# Altium PCB Bracelet_Main.PcbDoc (part 3 of 3)
Units mil, origin at the board's own origin, x right, y up, seen from the top; angles counter-clockwise.
Board outline 865.94 x 2303.17 mil, 4 copper layers (Top Layer, POWER, GND, Bottom Layer), stack 7.834 mil thick; 115 components, 70 nets, 405 pads, 108 vias.
Unrouted connection lines stored in the file: 2.
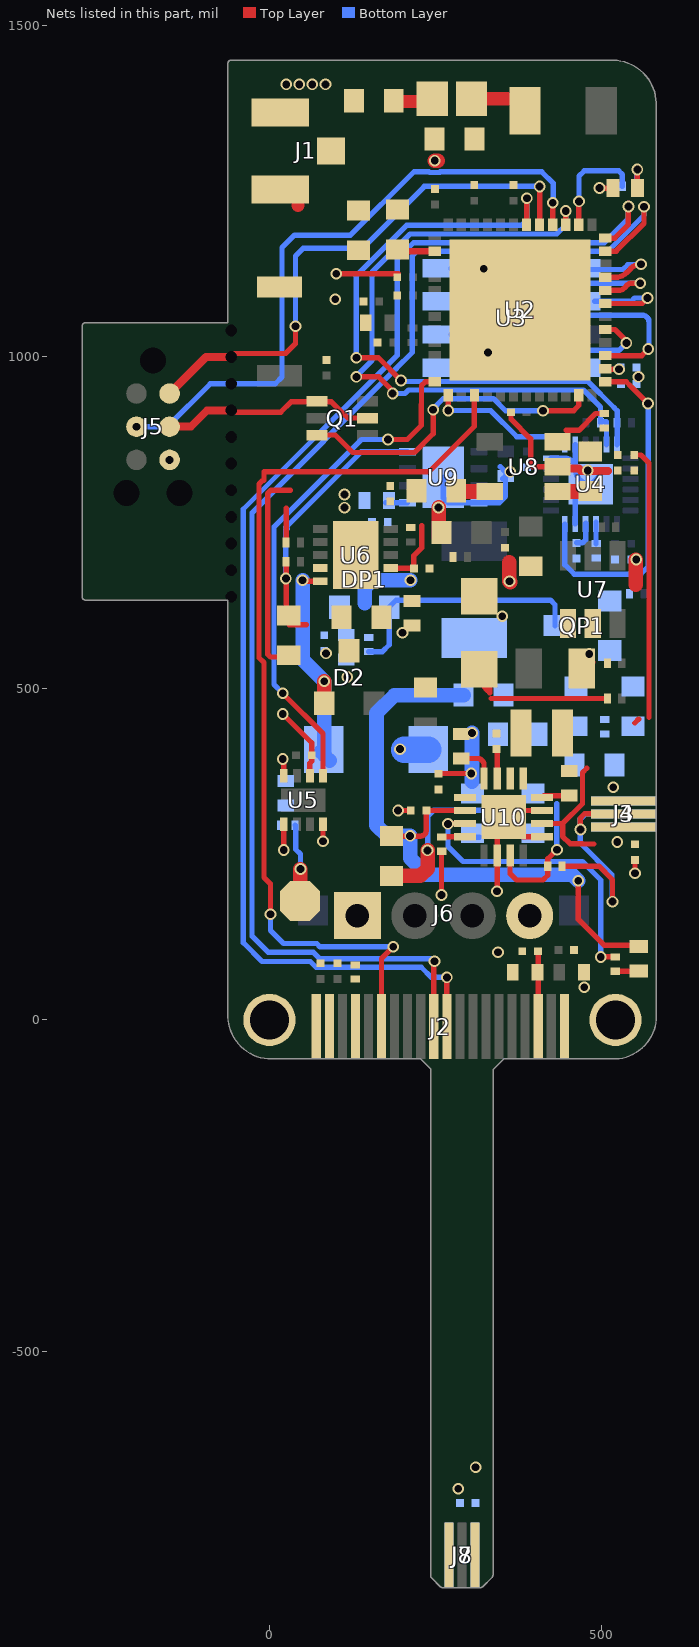
[diagram p4: the nets of this part, all layers, seen from the top]

## Via types
v1: diameter 17.72, hole 11.81, Top Layer to Bottom Layer, tented both sides, 100 vias
v2: diameter 17.72, hole 11.81, Top Layer to Bottom Layer, tented top, 4 vias
v3: diameter 17.72, hole 11.81, Top Layer to Bottom Layer, 4 vias

## Nets (pads, with @x,y where several pads share a name; then routed paths per layer and width w, separated by ;. In a path a pad name is that pad's centre, name@x,y a point inside that pad or via, vN(x,y) a via of type N, cw(c..) or ccw(c..) an arc to the next point about the centre after c; other vN are vias at no path point) (continued)
FEED: SB1.1 SB2.1 U2.2 | length 58.1
  Top Layer w10: SB1.1@143.76,1161.26 SB1.1@145.88,1159.14 ; SB2.1@194.76,1160.26 195.88,1159.14 U2.2@249.36,1159.14
FEED#: C8.1 L1.2 SB2.2 | length 62.2
  Top Layer w20: C8.1@193.79,1384.83 L1.2@254.56,1384.83 ; L1.2@254.56,1385.83 L1.2@255.56,1384.83
GND: C1.2 C2.2 C3.2 C4.2 C5.2 C6.2 C7.2 C8.2 C9.2 C10.2 C11.2 C12.2 C13.2 C14.2 C15.2 C16.2 C17.1 C18.2 C20.2 C21.2 C22.2 C23.2 C24.2 C25.2 C26.2 C27.2 C28.2 C29.2 C30.2 C31.2 C32.2 C33.2 C34.2 C35.2 C36.2 C38.2 C39.2 C40.1 C41.2 C42.2 C45.2 C46.2 C47.2 C48.2 CP1.1 CU1.2 CU2.2 J1.2 J1.3 J2.1 J2.19 J2.20 J3.3 J4.1 J5.6 J6.4 J7.3 J8.1 LED1.2 pad.MH1 pad.MH2 pad.NC@-57.51,798.66 QP1.2 R3.1 R9.1 R12.1 R15.2 R16.2 RP3.1 SB10.2 SB14.2 SW1.2 U2.49 U3.4 U4.11 U4.18 U4.20 U4.25 U5.4 U5.6 U6.11 U7.2 U8.2 U9.4 U9.9 U10.6 U10.9 U10.11 U10.12 U10.17 | length 1994.9
  Top Layer w8: v1(20.08,461.42) 63.78,417.72 C18.2@63.78,399.21 63.78,389.76 61.02,387.01 U5.6@61.02,368.11 ; SW1.2@22.25,1113.56 SW1.2@31.68,1113.56 ; R12.1@25.31,719.91 25.31,771.66 ; C30.2@29.13,547.24 1.58,547.24 -2.74,551.56 -2.74,793.72 2.36,798.82 31.89,798.82 ; SW1.2@38.18,1115.49 ccw(c38.18,1103.56) SW1.2@31.68,1113.56 ; SW1.2@40.76,1115.05 27.76,1102.05 26.25,1103.56 cw(c38.18,1103.56) SW1.2@31.68,1113.56 ; v1(80.71,269.29) U5.4@80.71,295.07 ; v1(100.79,1125.2) C5.2@194.35,1125.2 ; C5.2@192.14,1119.26 C5.2@192.65,1119.77 ; v1(194.1,315.75) C38.2@212.99,315.75 ; C36.2@255.42,371.26 255.63,371.47 v1(304.25,371.47) ; C36.2@258.22,371.24 258.22,370.91 C36.2@258.57,371.26 ; v1(259.45,188.19) 259.45,253.94 R15.2@259.84,254.33 ; v1(343.31,194.09) U10.6@343.31,247.83 343.31,296.06 U10.17@353.15,305.91 ; C6.2@364.12,916.19 364.12,905.84 393.85,876.11 393.85,837.25 396.85,834.25 U8.2@434.62,834.25 ; U10.11@411.22,315.75 362.99,315.75 U10.17@353.15,305.91 ; U10.12@411.22,335.43 413.98,338.19 C39.2@451.97,338.19 ; U10.9@421.26,277.16 412.01,277.16 U10.9@411.22,276.38 382.68,276.38 U10.17@353.15,305.91 ; C25.2@486.76,538.1 C25.2@487.76,539.1 ; v1(497.76,1254.26) LED1.2@517.76,1254.26 ; 510.76,827.95 511.25,828.44 ; C20.2@525.25,828.44 C20.2@525.44,828.25 ; v1(551.18,221.26) C41.2@551.18,241.34 C41.2@552.76,239.76
  Top Layer w12: U8.2@434.62,834.25 434.62,831.25 466.76,831.25 469.67,828.34 ; 510.76,827.95 v1@483.07,827.95 ; 469.67,828.34 470.06,827.95 v1@483.07,827.95 ; 469.67,828.34 v1(479.92,828.34) 482.68,828.34 v1@483.07,827.95
  Top Layer w20: 43.06,1228.19 43.21,1228.35
  Top Layer w22: v1(249.21,1295.67) v1@253.54,1295.67 ; CP1.1@255.12,728.74 v1@255.12,772.65 ; 361.81,690.16 v1(361.81,661.42) v1@362.85,660.38 ; 552.44,655.91 v1@552.44,694.09
  Bottom Layer w8: v1@111.02,788.98 v1@113.39,788.98 ; v1@111.42,770.47 ccw(c111.42,772.44) v1(113.39,772.44) ; U9.9@262.1,818.25 262.1,787.25 269.49,779.87 U9.4@316.24,779.87 346.72,779.87 356.1,789.25 C34.2@356.1,820.25 C34.2@351.83,815.98 ; U3.4@273.72,1133.56 ccw(c274.72,1133.56) 274.72,1132.56 v1(323.25,1132.56) ; 348.03,834.25 355.91,826.38 v1(362.99,826.38) ; U4.18@424.81,847.04 445.26,847.04 cw(c445.26,831.29) U4.25@461.01,831.29 ; U4.11@461.01,747.84 461.01,784.05 cw(c484.63,784.05) U4.25@484.63,807.67 ; U4.20@461.01,867.5 U4.25@461.01,831.29 ; U4.25@496.76,819.8 U4.25@484.63,807.67 ; U4.25@461.01,831.29 ccw(c484.63,831.29) U4.25@484.63,807.67
  Bottom Layer w22: 305.51,359.53 v1(305.51,432.68)
  other v1: 474.8,49.21 344.49,101.97 518.5,350.79 482.28,551.97 85.43,552.75 200.79,583.86 553.15,694.09 254.76,772.65 113.39,792.13 556.69,969.68 329.76,1006.26 99.21,1086.61
  other v2: 25.31,1410.67 45,1410.67 64.68,1410.67 84.37,1410.67
  other v3: 310.95,-674.61 -150.51,844.5
GPIO17: U2.27 U3.2 | length 434.7
  Top Layer w8: U2.27@508.34,1003.56 ccw(c508.34,1001.66) U2.27@506.45,1001.66 561.36,1001.66 v1(571.25,1011.56)
  Bottom Layer w8: U3.2@273.72,1033.56 283.72,1033.56 ; 389.61,1033.56 405.06,1033.56 ccw(c405.06,1050.26) 421.76,1050.26 cw(c434.06,1050.26) 434.06,1062.56 562.25,1062.56 ; 563.25,1062.56 562.25,1062.56 ; v1@569.25,1013.56 v1@569.25,1014.56 ; v1@572.25,1012.56 572.25,1052.56 ccw(c562.25,1052.56) 562.25,1062.56
  Bottom Layer w22: 283.72,1033.56 389.61,1033.56
INT1: U2.25 U4.12 | length 524.3
  Top Layer w8: U2.25@506.45,962.29 538.1,962.29 545.28,955.12 ; 543.7,956.69 v1(571.01,929.39)
  Bottom Layer w8: U4.12@445.26,747.84 445.26,686.5 459.71,672.05 559.84,672.05 571.01,683.21 v1(571.01,929.39)
INT2: U2.13 U4.19 | length 185.3
  Top Layer w8: v1@269.64,920.52 U2.13@269.64,942.02
  Bottom Layer w8: v1(269.68,918.9) 333.52,918.9 373.04,879.39 417.12,879.39
IO_0: Q1.3 U2.23 | length 487.9
  Top Layer w8: Q1.3@71.65,881.89 99.21,881.89 125.59,855.51 218.5,855.51 246.85,883.86 v1(246.85,920.08) ; v1(412.6,918.5) 458.66,918.5 466.49,926.33 U2.23@466.49,942.02
  Bottom Layer w8: v1@245.85,920.6 262.03,936.78 337.96,936.78 356.24,918.5 v1(412.6,918.5)
LED_PIN_: R2.2 U2.38 | length 162.7
  Top Layer w8: U2.38@466.49,1199.1 466.49,1234.54 v1(466.76,1234.26)
  Top Layer w10: U2.38@466.18,1199.1 U2.38@466.49,1199.1
  Bottom Layer w8: v1(466.76,1234.26) 466.76,1272.26 474.76,1280.26 526.76,1280.26 532.11,1274.91 R2.2@532.11,1257.26
LX_: D2.1 L3.1 U6.4 U6.5 | length 347.6
  Top Layer w8: v1@50.96,661.91 51.33,661.54 U6.5@76.82,661.54
  Top Layer w22: D2.1@82.68,477.56 v1(82.68,510.63)
  Bottom Layer w22: v1(49.96,662.91) 49.96,543.31 v1(82.68,510.63) 82.64,404.46 L3.1@77.28,404.46 ; L3.1@82.64,399.09 L3.1@90.56,391.18
NetAE_1: AE.1 C7.1 L1.1 | length 60.5
  Top Layer w20: L1.1@298.62,1388.83 359.11,1388.83
NetC17_2: C17.2 U4.10 | length 40.9
  Bottom Layer w8: C17.2@462.99,719.29 472.05,719.29 476.76,724 U4.10@476.76,747.84 U4.10@476.76,749.2
NetC19_1: C19.1 R6.1 U5.1 | length 31.1
  Top Layer w8: v1(21.65,256.3) U5.1@21.65,287.4
NetC19_2: C19.2 U5.8 | length 25.2
  Top Layer w8: U5.8@21.65,368.11 v1@21.65,393.31
  other v1: 20.08,393.31
NetC37_1: C37.1 L4.1 U10.13 U10.14
NetC37_2: C37.2 U10.15 | length 45
  Top Layer w8: C37.2@342.42,408.51 cw(c342.42,407.63) 343.31,407.63 U10.15@343.31,363.98
NetC40_2: C40.2 U10.16 | length 60.6
  Top Layer w8: C40.2@289.07,394.33 313.53,394.33 cw(c313.53,384.24) 323.62,384.24 U10.16@323.62,363.98
NetD1_K: D1.K R8.1 SB6.1 | length 223
  Top Layer w8: D1.K@316.93,525.2 ccw(c357.48,525.2) 332.24,493.46 D1.K@332.24,504.63 ; 334.25,484.65 R8.1@509.63,484.65
NetDP1_1: DP1.1 QP1.3 RP1.1 | length 380.9
  Bottom Layer w8: RP1.1@149.61,555.28 170.24,555.28 180.71,565.75 DP1.1@180.71,622.44 191.28,633.02 423.68,633.02 430.71,625.98 QP1.3@430.71,594.49
NetJ1_1: J1.1 SB1.2
NetJ2_17: J2.17 R16.1 | length 20
  Top Layer w8: J2.17@128.35,-1.17 J2.17@129.73,-2.55 ; J2.17@129.73,-2.55 132.28,-5.11 131.5,-5.89 132.68,-7.08 J2.17@129.73,-10.02 J2.17@129.73,-2.55
NetLED1_1: LED1.1 R2.1 | length 53.4
  Top Layer w8: LED1.1@554.76,1254.26 v1(554.76,1282.26)
  Bottom Layer w8: R2.1@553.76,1257.26 553.76,1281.26 v1(554.76,1282.26)
NetLED2_2: LED2.2 R14.1 | length 36.2
  Top Layer w8: R14.1@528.74,73.63 LED2.2@564.96,73.63
NetP2_1: P2.1 R6.2 | length 122.8
  Top Layer w22: v1@46.26,226.97 P2.1@46.26,179.53 ccw(c41.05,184.75) P2.1@48.43,184.75
  Bottom Layer w8: R6.2@38.63,293.7 39.51,292.82 39.51,257.34 46.85,250 v1(46.85,227.56)
NetQP1_1: QP1.1 RP2.1
NetR3_2: R3.2 U4.9 | length 32.1
  Bottom Layer w8: R3.2@492.51,718.11 U4.9@492.51,747.84 U4.9@492.51,750.2
NetR14_2: R14.2 U10.3 | length 453.3
  Top Layer w8: v1@266.54,296.06 v1@269.69,296.06 ; v1(269.29,295.67) v1@269.69,296.06 ; U10.3@295.08,296.06 v1@269.69,296.06 ; v1@499.61,96.06 500.39,95.28 R14.2@521.65,95.28
  Bottom Layer w8: v1(269.29,295.67) 269.29,261.42 291.87,238.83 324.61,238.83 324.73,238.95 361.89,238.95 362.01,238.83 471.8,238.83 499.61,211.02 499.61,185.89 499.46,185.74 499.46,95.02 v1(499.61,94.88)
NetR15_1: R15.1 U10.4 | length 35.2
  Top Layer w8: R15.1@259.84,276.38 U10.4@295.08,276.38
NetR18_1: R18.1 SB8.1 SB10.1
NetR18_2: R18.2 SB7.2 SB9.2
NetR19_1: R19.1 SB12.1 SB14.1 | length 21
  Bottom Layer w8: SB14.1@295.24,275.43 SB14.1@316.24,275.43
NetR19_2: R19.2 SB11.2 SB13.2 | length 247.1
  Top Layer w22: SB11.2@193.31,217.17 227.4,217.17 238.53,228.29 v1(238.53,255.67)
  Bottom Layer w8: v1(238.53,255.67) 238.53,306.64 247.98,316.09 346.91,316.09 R19.2@351.57,311.42
NetSB3_2: SB3.2 U8.1 | length 37.2
  Top Layer w22: U8.1@436.62,796.85 SB3.2@473.85,796.85
NetSB4_1: SB4.1 U8.5 | length 50.9
  Top Layer w22: SB4.1@281.76,795.59 SB4.1@282.87,794.49 ; SB4.1@282.87,796.85 U8.5@332.25,796.85
NTC: J3.2 J4.2 R17.1 | length 418.2
  Top Layer w8: R17.1@441.34,231.89 496.85,231.89 517.32,211.42 v1(517.32,178.35) ; v1(468.9,287.01) 468.9,304.45 475.53,311.08 505.91,311.08 506.36,310.63 J3.2@534.25,310.63 J3.2@534.65,310.63
  Bottom Layer w8: v1@466.14,287.79 v1@466.93,287.01 ; v1@516.54,178.35 516.54,218.82 468.9,266.46 v1(468.9,287.01) 468.9,303.15 476.38,310.63 J4.2@534.25,310.63 J4.2@534.65,310.63
PMIC_EN: RF1.1 U8.3 | length 76.3
  Top Layer w8: U8.3@434.62,871.65 U8.3@442.91,871.65 ; 447.58,889.04 466.59,889.04 491.93,914.37 RF1.1@505.12,914.37
REGN: C38.1 LED2.1 SB7.1 SB11.1 U10.2 | length 985.2
  Top Layer w8: SB11.1@196.06,277.56 SB11.1@195.67,277.17 ; U10.2@295.08,315.75 C38.1@236.61,315.75 236.61,286.13 cw(c227.64,286.13) 227.64,277.17 SB11.1@195.67,277.17 ; v1(465.75,209.84) 465.75,151.57 504.58,112.74 562.85,112.74 LED2.1@564.96,110.63 ; SB11.1@195.67,277.17 194.49,275.98 193.31,277.17 SB11.1@195.67,277.17
  Bottom Layer w22: SB7.1@292.83,489.76 188.58,489.76 161.42,462.6 161.42,293.7 177.56,277.56 v1(212.2,277.56) 212.2,244.09 237.47,218.83 332.89,218.83 333.01,218.95 353.6,218.95 353.72,218.83 456.76,218.83 v1(465.75,209.84)
RES#: J2.15 U2.15 | length 1420.9
  Top Layer w8: v1(1.57,159.45) 1.57,205.21 -8.25,215.03 -8.25,538.69 -15.74,546.17 -15.74,799.1 -15.69,799.15 -15.69,808.06 -10.42,813.33 -8.25,813.33 -8.25,826.38 240.27,826.38 309.01,895.12 U2.15@309.01,942.02 ; J2.15@167.32,-8.25 J2.15@169.1,-10.02 169.1,92.72 v1(186.61,110.24)
  Bottom Layer w8: v1(1.57,159.45) 1.57,135.04 21.45,115.17 71.31,115.17 76.24,110.24 v1(186.61,110.24)
RTS: J5.4 pad.NC@-57.51,919.13 Q1.1 Q1.5 | length 327.9
  Top Layer w8: pad.NC@-57.51,919.13 -57.51,916.5 17.01,916.5 32.39,931.89 93.7,931.89 118.11,907.48 Q1.5@148.03,907.48
  Top Layer w12: J5.4@-150.51,894.5 -118.51,894.5 -93.88,919.13 pad.NC@-57.51,919.13
RXD: J5.3 pad.NC@-57.51,959.29 U2.40 | length 972.6
  Top Layer w8: U2.40@427.12,1199.1 v1(427.12,1232.26)
  Bottom Layer w8: v3(-200.51,894.5) -153.92,894.5 -89.13,959.29 pad.NC@-57.51,959.29 8.8,959.29 19,969.5 19,1164.5 37.76,1183.26 122.24,1183.26 217.86,1278.88 240.75,1278.88 241.82,1277.81 256.61,1277.81 257.68,1278.88 410.55,1278.88 427.76,1261.66 427.76,1232.91 v1(427.12,1232.26)
SCL: R4.1 U2.39 U4.23 | length 993.5
  Top Layer w8: v1(131.1,969.68) 164.88,969.68 185.83,948.74 v1(185.83,944.49) ; U2.39@446.8,1199.1 v1(446.8,1219.73)
  Bottom Layer w8: v1@129.92,969.68 154.72,994.49 154.72,1127.61 212.17,1185.06 433.09,1185.06 446.8,1198.77 v1(446.8,1219.73) ; v1(185.83,944.49) 204.28,944.49 209.58,949.78 473.45,949.78 499.08,924.15 R4.1@499.08,904.25 ; R4.1@499.08,900.5 R4.1@499.08,904.25 ; U4.23@508.25,867.5 508.25,902.36 500.97,902.36 R4.1@499.08,904.25
SCLK: U2.31 U3.6 | length 164.8
  Top Layer w8: U2.31@507.45,1081.4 U2.31@506.45,1080.4 ; U2.31@508.29,1078.56 U2.31@506.45,1080.4 ; v1(570.25,1088.56) 562.1,1080.4 U2.31@506.45,1080.4
  Bottom Layer w8: U3.6@490.25,1083.56 545.76,1083.56 550.76,1088.56 v1@567.25,1088.56 ; v1@573.25,1086.56 566.84,1086.56 ccw(c562.25,1088.56) v1@567.25,1088.56 ; v1@573.25,1088.56 v1(570.25,1088.56) v1@567.25,1088.56
SCLK_: J2.11 U2.35 | length 2008.8
  Top Layer w8: J2.11@247.04,-0.97 J2.11@247.84,-1.76 ; J2.11@247.84,-10.02 J2.11@247.84,-1.76 ; v1(248.82,88.58) 247.84,87.6 J2.11@247.84,-1.76 ; J2.11@250.39,0.79 J2.11@247.84,-1.76 ; U2.35@506.45,1159.14 522.84,1159.14 564.76,1201.07 v1(564.76,1226.26)
  Bottom Layer w8: v1(248.82,88.58) 245.02,92.38 75.71,92.38 65.92,102.17 -2.17,102.17 -26.4,126.4 -26.4,764.6 191.03,982.03 191.09,982.03 215.35,1006.3 215.35,1151.47 222.94,1159.06 510.56,1159.06 564.76,1213.26 v1(564.76,1226.26)
SD0: U2.32 U3.3 | length 362.3
  Top Layer w8: U2.32@506.45,1100.09 526.59,1100.09 ccw(c526.59,1112.35) 535.25,1103.68 540.21,1108.63 cw(c545.61,1103.25) 545.61,1110.87 v1(559.25,1110.87)
  Bottom Layer w8: 386.76,1083.56 409.06,1083.56 ccw(c409.06,1096.26) 421.76,1096.26 cw(c436.38,1096.26) 436.38,1110.87 v1(559.25,1110.87) v1@560.11,1110.87 ; v1@559.25,1112.87 ccw(c540.7,1094.32) 556.96,1114.91 cw(c554.25,1109.56) v1@560.11,1110.87 ; v1@562.41,1110.87 v1@561.57,1110.87 ; v1@560.11,1110.87 cw(c554.25,1109.56) 560.25,1109.56 v1@561.57,1110.87 ; v1@560.11,1110.87 v1@561.57,1110.87
  Bottom Layer w22: 283.72,1083.56 386.76,1083.56
SD1: U2.33 U3.5 | length 152.7
  Top Layer w8: U2.33@506.45,1119.77 522.08,1119.77 ccw(c522.08,1142.64) 538.24,1126.46 545.04,1133.26 ; 545.04,1133.26 cw(c560.25,1118.05) v1(560.25,1139.56)
  Bottom Layer w8: U3.5@473.25,1133.56 ccw(c478.08,1138.39) 478.08,1131.56 533.25,1131.56 540.25,1138.56 558.25,1138.56 cw(c558.25,1136.56) 560.25,1136.56 v1@560.25,1137.56
SD3: U2.29 U3.1 | length 315.8
  Top Layer w8: U2.29@506.45,1041.03 520.99,1041.03 v1@539.67,1022.35 ; v1(538.19,1020.86) v1@538.99,1020.86
  Bottom Layer w8: 283.72,983.56 340.56,983.56 ccw(c340.56,996.26) 353.26,996.26 cw(c366.56,996.26) 366.56,1009.56 526.88,1009.56 v1(538.19,1020.86)
SDA: R5.1 U2.42 U4.24 | length 967.8
  Top Layer w8: v1(131.1,998.43) 164.17,998.43 v1(198.42,964.17) ; U2.42@387.75,1199.1 388.19,1199.55 v1(388.19,1238.97) v1@388.19,1240.55
  Bottom Layer w8: v1(131.1,998.43) 131.1,1122.37 206.79,1198.06 380.34,1198.06 388.19,1205.9 v1(388.19,1238.97) ; v1(198.42,964.17) 199.82,962.78 480.23,962.78 519.94,923.07 519.94,922.92 524.25,918.6 R5.1@524.25,900.5 524.25,867.75 U4.24@524,867.5
SDIN_: J2.10 U2.36 | length 2000.6
  Top Layer w8: J2.10@266.26,-8.76 J2.10@267.52,-10.02 ; v1(267.52,64.17) J2.10@267.52,-10.02 ; J2.10@268.5,-9.04 J2.10@267.52,-10.02 ; U2.36@506.45,1178.83 520.76,1178.83 541.25,1199.32 v1(541.25,1226.56) v1@541.25,1231.56
  Bottom Layer w8: v1(267.52,64.17) 244.09,64.17 228.89,79.38 70.33,79.38 61.51,88.2 -11.03,88.2 -39.4,116.57 -39.4,769.99 185.64,995.03 185.7,995.03 192.52,1001.85 192.52,1147.02 217.56,1172.06 505.17,1172.06 541.25,1208.13 v1(541.25,1226.56)
SW_AD: D1.A L2.2 U7.1
  other v1: 351.18,608.66
TCH_OUT: U2.12 U5.5 | length 771.8
  Top Layer w8: v1@21.65,490.94 80.71,431.89 U5.5@80.71,368.11 ; v1(178.74,875.2) 207.87,875.2 228.99,896.31 228.99,927.47 229.28,927.77 229.28,956.45 235.13,962.29 U2.12@249.36,962.29
  Bottom Layer w8: v1(20.08,492.52) 6.94,505.65 6.94,743.44 138.7,875.2 v1(178.74,875.2)
TS: R17.2 SB8.2 SB9.1 SB12.2 SB13.1 U10.7 | length 198.8
  Top Layer w8: U10.7@362.85,241.97 362.85,220.62 372.44,211.02 412.6,211.02 419.68,218.11 R17.2@419.68,231.89 419.68,242.91 v1(433.46,256.69)
  Bottom Layer w8: 433.07,325.98 433.07,257.09 v1(433.46,256.69)
TXD: J5.2 pad.NC@-57.51,999.45 U2.41 | length 826.5
  Top Layer w8: pad.NC@-57.51,999.45 -52.19,1004.77 24.46,1004.77 39.37,1019.68 v1(39.37,1046.06) ; U2.41@407.43,1199.1 406.76,1199.77 407.48,1200.49 v1(407.48,1256.69)
  Top Layer w12: J5.2@-150.51,944.5 -95.57,999.45 pad.NC@-57.51,999.45
  Bottom Layer w8: v1(39.37,1046.06) 39.37,1151.97 50.79,1163.39 140.16,1163.39 233.6,1256.83 407.34,1256.83 v1(407.48,1256.69) v1@405.05,1254.26
VBAT: C22.1 C23.1 C24.1 C28.1 C29.1 DP1.2 L3.2 R13.1 RP1.2 SB4.2 U6.7 | length 235.5
  Top Layer w8: U6.7@183.11,681.22 215.79,681.22 C28.1@215.79,680.91 ; C28.1@217.75,680.91 217.75,700.03 229.53,711.81 229.53,745.28
  Bottom Layer w22: 143.7,628.35 143.7,651.57 155.12,662.99 v1(212.6,662.99)
  Bottom Layer w40: v1@203.03,407.6 L3.2@239.48,407.6
  other v1: 196.85,408.27
VBAT#: C20.1 C21.1 C39.1 C41.1 J3.1 J4.3 L4.2 RF1.2 SB3.1 U10.10 | length 626.3
  Top Layer w8: U10.10@411.22,296.06 442.13,296.06 ; 465.29,265.35 472.05,265.35 ; 478.43,379.53 472.05,373.14 472.05,325.98 442.13,296.06 ; 488.98,265.35 472.05,265.35 ; C21.1@550.01,851.87 560.33,851.87 572.44,839.76 572.44,456.3 ; 550.79,447.64 556.69,453.54 ; 442.13,296.06 442.13,276.77 453.15,265.75 471.65,265.75 472.05,265.35
  other v1: 524.41,268.11
VBUS: C30.1 C31.1 C32.1 C33.1 C42.1 D2.3 J7.1 J8.3 R11.1 U9.5 U9.8 | length 465.6
  Top Layer w8: R11.1@25.31,690.91 25.31,620.38 29.37,616.31 29.37,595.91 55.96,595.91
  Bottom Layer w8: v1(24.8,665.75) 24.8,738.19 27.17,740.55 24.8,742.91 138.53,856.64 U9.8@207.97,856.64 ; C32.1@174.99,779.87 U9.5@207.97,779.87
  other v1: 284.63,-707.02 117.32,516.93
VCHG: C36.1 J6.1 U10.1
VCOMH_: C47.1 C48.1 J2.3 | length 113.7
  Top Layer w8: J2.3@403.94,-8.64 J2.3@405.32,-10.02 C48.1@405.32,101.77
VDDSDIO: C12.1 C13.1 U2.26 U3.8 | length 21.4
  Top Layer w8: U2.26@506.45,981.98 507.72,980.71 508.11,981.1 v1(527.16,981.1)
pads on no net: AE.2 D2.2 J2.4 J2.5 J2.6 J2.7 J2.8 J2.9 J2.12 J2.13 J5.MP5 J5.MP6 J5.MP7 J6.2 J6.3 J6.MP1 J6.MP2 J7.2 J8.2 U2.5 U2.6 U2.7 U2.8 U2.10 U2.11 U2.18 U2.20 U2.21 U2.22 U2.24 U2.28 U2.34 U2.44 U2.45 U2.47 U2.48 U4.1 U4.2 U4.3 U4.4 U4.5 U4.6 U4.7 U4.14 U4.15 U4.16 U4.17 U4.21 U5.2 U5.3 U5.9 U6.1 U6.3 U6.6 U6.8 U6.10 U7.6 U8.4 U9.2 U9.3 U9.6 U9.7 U10.5 U10.8

## Polygon pours and split planes (outlines as drawn)
GND on Bottom Layer "Polygon_2" (hatched 45Degree grid 20 track 15, remove dead copper, pour order 4): 42.52,45.28 470.87,45.28 478.74,53.15 478.74,1343.31 42.52,1343.31
GND on Top Layer "Polygon_1" (hatched 45Degree grid 20 track 15, remove dead copper, pour order 6): 42.52,45.28 470.87,45.28 478.74,53.15 478.74,1343.31 42.52,1343.31
3V3 on POWER (split plane): 522.25,1425.81 522.25,1426.8 523.05,1426.74 528.99,1425.56 534.72,1423.62 540.14,1420.94 545.17,1417.58 549.72,1413.59 553.71,1409.04 557.07,1404.01 559.75,1398.58 561.69,1392.85 562.88,1386.92 563.16,1382.64 563.15,1382.61 563.17,1382.46 563.18,1382.27 563.17,1382.18 561.93,1382.18 562.49,1380.81 563.17,1380.87 563.17,619.14 319.16,619.14 319.16,970.47 318.82,973.9 317.82,977.2 316.2,980.24 314.01,982.91 288.81,1008.1 286.15,1010.29 283.11,1011.91 279.81,1012.92 276.38,1013.25 80.71,1013.25 77.28,1012.92 73.98,1011.91 70.94,1010.29 68.27,1008.1 66.09,1005.44 64.46,1002.4 63.46,999.1 63.12,995.67 63.12,622.72 63.12,107.88 63.12,107.87 63.46,104.44 64.46,101.14 66.09,98.1 68.27,95.44 134.6,29.11 134.6,-38.66 -0.57,-38.66 -0.52,-38.06 -1.88,-37.5 -4.05,-38.4 -8.61,-37.49 -14.34,-35.55 -19.77,-32.87 -24.8,-29.51 -29.35,-25.52 -33.34,-20.97 -36.7,-15.94 -39.38,-10.52 -41.32,-4.79 -42.5,1.15 -42.61,2.76 -41.53,5.37 -41.73,5.85 -42.65,5.82 -42.55,6.86 -42.55,633.02 -42.94,636.94 -44.08,640.71 -45.94,644.18 -48.44,647.23 -51.48,649.73 -54.96,651.58 -58.73,652.73 -62.65,653.11 -262.24,653.11 -262.24,1031.22 -62.65,1031.22 -58.73,1031.6 -54.96,1032.75 -51.48,1034.6 -48.44,1037.1 -45.94,1040.15 -44.08,1043.62 -42.94,1047.39 -42.55,1051.31 -42.55,1427.06 519.24,1427.06
no net on POWER (split plane): -42.75,4.86 -42.68,5.5
VBUS on POWER (split plane): 139.5,539.06 139.5,422.05 139.84,418.62 140.84,415.32 142.47,412.28 144.65,409.61 301.74,252.53 303.2,251.33 304.4,250.34 307.44,248.71 310.74,247.71 314.17,247.38 420.21,247.38 420.21,229.13 420.55,225.7 421.55,222.4 423.17,219.36 425.33,216.74 425.33,158.07 389.93,122.67 387.74,120.01 386.12,116.97 385.12,113.67 384.78,110.24 384.78,-38.66 353.47,-38.66 349.55,-39.04 345.78,-40.19 342.3,-42.05 339.26,-44.54 339.15,-44.67 339.08,-44.74 338.19,-43.86 337.85,-44.7 338.51,-45.3 322.96,-60.85 320.46,-63.9 318.61,-67.37 317.46,-71.14 317.08,-75.06 317.08,-830.74 311.9,-835.92 267.42,-835.92 263.24,-831.74 263.24,-74.06 262.85,-70.14 261.71,-66.37 259.85,-62.9 257.35,-59.85 242.8,-45.3 243.47,-44.7 243.12,-43.86 242.24,-44.74 242.16,-44.67 242.06,-44.54 239.01,-42.05 235.54,-40.19 231.77,-39.04 227.85,-38.66 169.77,-38.66 169.77,36.39 169.44,39.82 168.44,43.12 166.81,46.16 164.62,48.83 98.29,115.16 98.29,580.27
VBAT on POWER (split plane): 283.99,963.19 283.99,461.42 284.33,457.99 285.33,454.69 286.95,451.65 289.14,448.98 425.33,312.79 425.33,282.55 321.46,282.55 174.67,429.33 174.67,546.34 174.67,546.35 174.33,549.78 173.33,553.08 171.71,556.12 170.51,557.58 169.52,558.78 98.29,630.01 98.29,978.08 269.09,978.08
12V on POWER (split plane): 563.16,477.56 563.17,477.48 563.17,3.45 563.22,2.94 562.83,2.97 562.27,1.62 563.17,-0.55 562.26,-5.12 560.31,-10.85 557.64,-16.27 554.28,-21.3 550.29,-25.85 545.74,-29.84 540.71,-33.2 535.28,-35.88 529.55,-37.83 526.48,-38.44 526.48,-37.41 523.77,-38.54 523.79,-38.66 419.95,-38.66 419.95,102.95 455.35,138.35 456.33,139.55 457.53,141.02 459.16,144.06 460.16,147.36 460.5,150.79 460.5,320.08 460.16,323.51 459.16,326.81 457.53,329.85 456.33,331.31 455.35,332.51 319.16,468.7 319.16,583.98 563.16,583.98
GND on GND (split plane): 522.25,1425.81 522.25,1426.8 523.05,1426.74 528.99,1425.56 534.72,1423.62 540.14,1420.94 545.17,1417.58 549.72,1413.59 553.71,1409.04 557.07,1404.01 559.75,1398.58 561.69,1392.85 562.88,1386.92 563.16,1382.64 563.15,1382.61 563.17,1382.46 563.18,1382.27 563.17,1382.18 561.93,1382.18 562.49,1380.81 563.17,1380.87 563.17,3.45 563.22,2.94 562.83,2.97 562.27,1.62 563.17,-0.55 562.26,-5.12 560.31,-10.85 557.64,-16.27 554.28,-21.3 550.29,-25.85 545.74,-29.84 540.71,-33.2 535.28,-35.88 529.55,-37.83 526.48,-38.44 526.48,-37.41 523.77,-38.54 523.79,-38.66 353.47,-38.66 349.55,-39.04 345.78,-40.19 342.3,-42.05 339.26,-44.54 339.15,-44.67 339.08,-44.74 338.19,-43.86 337.85,-44.7 338.51,-45.3 322.96,-60.85 320.46,-63.9 318.61,-67.37 317.46,-71.14 317.08,-75.06 317.08,-830.74 311.9,-835.92 267.42,-835.92 263.24,-831.74 263.24,-74.06 262.85,-70.14 261.71,-66.37 259.85,-62.9 257.35,-59.85 242.8,-45.3 243.47,-44.7 243.12,-43.86 242.24,-44.74 242.16,-44.67 242.06,-44.54 239.01,-42.05 235.54,-40.19 231.77,-39.04 227.85,-38.66 -0.57,-38.66 -0.52,-38.06 -1.88,-37.5 -4.05,-38.4 -8.61,-37.49 -14.34,-35.55 -19.77,-32.87 -24.8,-29.51 -29.35,-25.52 -33.34,-20.97 -36.7,-15.94 -39.38,-10.52 -41.32,-4.79 -42.5,1.15 -42.61,2.76 -41.53,5.37 -41.73,5.85 -42.65,5.82 -42.55,6.86 -42.55,633.02 -42.94,636.94 -44.08,640.71 -45.94,644.18 -48.44,647.23 -51.48,649.73 -54.96,651.58 -58.73,652.73 -62.65,653.11 -262.24,653.11 -262.24,1031.22 -62.65,1031.22 -58.73,1031.6 -54.96,1032.75 -51.48,1034.6 -48.44,1037.1 -45.94,1040.15 -44.08,1043.62 -42.94,1047.39 -42.55,1051.31 -42.55,1427.06 519.24,1427.06
GND on GND (split plane): 563.43,0.78 563.25,2.63

## Other copper
Top Layer:
  rectangle net 3V3: 41.34,53.94 114.57,68.5
  rectangle net GND: -5.91,-59.06 96.85,40.16
  rectangle net GND: -4.72,-52.36 31.5,84.65
  rectangle net GND: -4.72,74.41 137.01,91.73
  rectangle net 3V3: 41.34,45.67 114.57,61.81
  rectangle net NetJ2_17: 122.44,-59.06 137.01,64.57
  rectangle net GND: 333.86,50.79 388.19,112.2
  rectangle net GND: 453.54,-59.06 483.46,112.2
  rectangle net 12V: 420.47,48.03 448.03,113.39
  rectangle net VBUS: 260.24,-717.72 294.49,-696.85
  rectangle net GND: 4.33,531.1 94.09,565.35
  rectangle net GND: 438.19,-59.06 466.14,39.76
  rectangle net GND: 143.7,576.38 164.96,677.17
  rectangle net GND: 235.43,576.38 283.07,680.91
  rectangle net GND: 255.91,671.65 362.6,679.13
  rectangle net GND: 349.21,631.5 563.39,670.08
  rectangle net GND: 349.21,649.21 406.3,719.29
  rectangle net GND: 234.25,1253.07 264.96,1346.46
  rectangle net GND: 234.25,1246.85 374.41,1269.68
  rectangle net #EN_AD: 516.54,677.95 528.74,759.06
  rectangle net PMIC_EN: 414.17,858.27 459.33,900.79
  rectangle net GND: 150.79,752.36 190.55,787.8
  rectangle net GND: -6.69,752.36 164.57,804.33
  rectangle net VBAT: 173.23,797.64 208.66,816.14
  rectangle net GND: 74.41,988.58 96.85,1022.05
  rectangle net GND: 235.43,664.57 282.68,687.8
  rectangle net GND: 244.09,677.17 282.68,759.06
  rectangle net 3V3AD: 289.76,726.77 374.8,759.02
  rectangle net 3V3AD: 289.37,684.25 338.98,754.33
  rectangle net VBAT#: 497.76,843.7 537.4,901.18
  region net VBAT: 200,759.45 200,735.83 238.76,735.83 238.76,759.45
  region net VBAT#: 483.46,297.64 483.46,257.48 583.46,257.48 583.46,297.64
  region net GND: 482.28,359.06 482.28,323.23 583.86,323.23 583.86,359.06
  region net GND: 275.98,442.91 275.98,421.65 317.32,421.65 317.32,442.91
  region net GND: 394.09,342.13 394.09,307.87 429.53,307.87 429.53,342.13
  region net GND: 153.96,649.61 153.96,589.76 193.7,589.76 193.7,649.61
  region net NetC37_1: 335.83,469.29 335.83,422.05 373.62,422.05 373.62,469.29
  region net NetC37_1: 357.09,469.29 357.09,347.24 399.21,347.24 399.21,469.29
  region net VBAT#: 423.23,469.29 423.23,366.14 577.56,366.14 577.56,469.29
  region net VCHG: 114.57,354.72 114.57,134.25 152.76,134.25 152.76,354.72
  region net VCHG: 114.57,354.72 114.57,329.92 312.6,329.92 312.6,354.72
  region net VBUS: 99.61,607.2 99.61,505.91 138.58,505.91 138.58,607.2
  region net GND: -42.13,1368.31 -42.13,1083.56 62.99,1083.56 62.99,1368.31
  region net NetJ1_1: 71.26,1333.07 71.26,1203.94 155.51,1203.94 155.51,1333.07
  region net FEED#: 168.11,1422.05 168.11,1361.02 272.64,1361.02 272.64,1422.05
  region net SW_AD: 288.58,625.2 288.58,571.54 464.17,571.54 464.17,625.2
  region net GND: 450.94,555.71 450.94,499.21 515.67,499.21 515.67,555.71
  region net GND: 470.48,669.29 470.48,507.36 504.33,507.36 504.33,669.29
  region net 3V3AD: 474.41,733.07 474.41,677.95 500.79,677.95 500.79,733.07
  region net 3V3AD: 348.43,759.02 348.43,727.56 510.63,727.56 510.63,759.02
  region net VBUS: 9.06,637.31 9.06,575.31 138.58,575.31 138.58,637.31
  region net NetD1_K: 217.32,557.09 217.32,479.92 347.17,479.92 347.17,557.09
  region net RXD: -36.51,948.5 -36.51,970.72 -77.51,970.72 -77.51,948.5
  rectangle net VBAT: 199.61,735.43 238.76,816.14
  rectangle net FEED#: 168.11,1183.43 223.43,1389.43
  rectangle net FEED: 115.35,1146.26 221.26,1178.26
  rectangle net GND: 153.96,576.38 281.1,616.31
  rectangle net GND: 94.96,648.91 164.96,760.91
  rectangle net LX_: 65.96,655.91 88.06,686.91
  rectangle net VBAT: 202.5,622.31 227.63,686.91
  rectangle net GND: 120.76,1014.26 169.76,1028.26
  rectangle net GND: 123.76,1014.26 154.26,1096.26
  rectangle net GND: 74.41,1014.26 143.26,1096.26
  rectangle net GND: 186.76,1087.26 199.76,1129.26
  rectangle net ENABLE: 120.87,922.05 169.87,950
  rectangle net 3V3: 159.76,1051.26 181.26,1097.26
  rectangle net 3V3: 159.76,1034.26 215.76,1065.26
  rectangle net 3V3: 205.76,1034.26 224.76,1126.26
  rectangle net GND: 502.76,817.95 558.27,836.95
  rectangle net GND: -42.13,1341.73 144.88,1424.02
  rectangle net NetAE_1: 280.98,1300 413.78,1423.26
  rectangle net GND: 302.76,-856.3 319.29,-665.38
  region net TXD: -36.51,988.29 -36.51,1010.5 -77.51,1010.5 -77.51,988.29
  region net RTS: -36.51,907.82 -36.51,930.03 -77.51,930.03 -77.51,907.82
  region net DTR: -36.51,867.66 -36.51,889.87 -77.51,889.87 -77.51,867.66
  rectangle net VBUS: 260.24,-856.3 277.95,-696.85
  rectangle net VBAT#: 465.25,842.25 557.25,873.62
  rectangle net 3V3: 240.25,1119.77 258.25,1139.46
Bottom Layer:
  rectangle net GND: 225.98,762.2 294.09,787.25
  rectangle net GND: 343.64,806.3 392.52,840.94
  rectangle net INT2: 409.06,858.27 450.39,883.46
  rectangle net 3V3: 457.48,893.32 482.68,910.24
  rectangle net NetDP1_1: 164.96,603.94 211.42,641.73
  rectangle net 3V3AD: 125.59,683.46 286.61,731.89
  rectangle net GND: 102.36,533.46 128.35,544.09
  rectangle net GND: 76.77,544.09 128.35,563.39
  rectangle net VBAT: 76.13,570.08 157.48,642.52
  rectangle net GND: 546.85,952.76 580.32,996.46
  rectangle net NetQP1_1: 490.16,614.17 548.82,650
  rectangle net GND: 525.2,484.65 568.11,548.03
  rectangle net GND: 472.44,541.73 568.11,578.35
  rectangle net SW_AD: 259.84,546.46 370.47,624.02
  rectangle net 3V3AD: 259.45,683.46 386.61,751.97
  rectangle net GND: 102.76,744.88 163.78,801.18
  region net SCL: 493.7,909.06 493.7,893.29 512.6,893.29 512.6,909.06
  region net GND: 485.04,359.84 485.04,324.02 583.07,324.02 583.07,359.84
  region net VBAT#: 484.25,297.64 484.25,264.17 583.86,264.17 583.86,297.64
  region net NetR18_1: 521.85,458.66 521.85,365.35 566.14,365.35 566.14,458.66
  region net NetR18_1: 488.19,437.8 488.19,365.35 534.65,365.35 534.65,437.8
  region net NetR18_2: 488.19,477.95 488.19,446.85 514.57,446.85 514.57,477.95
  region net NetR18_2: 443.31,522.05 443.31,472.05 514.57,472.05 514.57,522.05
  region net NetR18_2: 335.04,509.84 335.04,472.05 475.59,472.05 475.59,509.84
  region net TS: 378.74,464.57 378.74,325.2 479.92,325.2 479.92,464.57
  region net NetR19_2: 329.53,449.21 329.53,301.97 370.87,301.97 370.87,449.21
  region net NetR19_1: 288.98,296.46 288.98,259.45 414.57,259.45 414.57,296.46
  region net NetC19_1: 16.14,339.76 16.14,312.99 38.98,312.99 38.98,339.76
  region net NetC19_1: 9.84,339.76 9.84,244.09 27.56,244.09 27.56,339.76
  region net NetC19_2: 9.06,402.36 9.06,350.39 38.19,350.39 38.19,402.36
  region net VDDSDIO: 446.8,997.26 446.8,972.05 517.76,972.05 517.76,997.26
  region net VDDSDIO: 512.6,997.26 512.6,950.39 538.58,950.39 538.58,997.26
  region net VBUS: 171.26,860.63 171.26,744.88 190.16,744.88 190.16,860.63
  region net TXD: -36.51,988.29 -36.51,1010.5 -77.51,1010.5 -77.51,988.29
  region net RXD: -36.51,947.5 -36.51,969.72 -77.51,969.72 -77.51,947.5
  rectangle net GND: 226.1,770.87 294.1,865.25
  rectangle net GND: 303.16,-856.3 320.47,-673.57
  rectangle net VBUS: 261.02,-740.57 294.55,-696.57
  region net RTS: -36.51,907.82 -36.51,930.03 -77.51,930.03 -77.51,907.82
  region net DTR: -36.51,867.66 -36.51,889.87 -77.51,889.87 -77.51,867.66
  rectangle net VBUS: 261.02,-856.3 278.35,-730.98
  rectangle net GND: 457.09,687.4 553.94,701.57
  pour cut-out: 220.47,757.87 220.87,540.94 399.61,540.55 395.61,755.7 222.05,757.48
  pour cut-out: 157.48,519.68
  pour cut-out: 48.03,505.12 46.85,308.27 274.8,310.63 274.41,505.12 48.03,505.51
POWER (plane layer: these items are gaps in the copper):
  lines w10: 568.25,477.56 568.25,601.56
  lines w30: 581.89,235.43 581.89,281.5
  lines w35: 152.19,-50.2 152.19,36.39 80.71,107.87 80.71,622.72 ; 304.25,601.56 568.25,601.56 ; 437.8,229.13 437.8,264.96 314.17,264.96 157.09,422.05 157.09,546.35 80.71,622.72 ; 458.27,-58.27 402.36,-58.27 402.36,110.24 442.91,150.79 442.91,320.08 301.57,461.42 301.57,970.47 276.38,995.67 244.35,995.67 80.71,995.67 80.71,622.72

## Silkscreen, mask and mechanical layers (free items; w line width, h text height)
Fllex1 Top Overlay 1:
  circle w10: c466.93,39.37 r3.61
  text "ANT" at 414.57,1285.43 h60
  text "JTAG" at -279.13,959.06 h50 r270
  text "This part will" at -276.51,711.5 h30
  text "be removed" at -276.51,680.5 h30
  text "after prog." at -276.51,644.5 h30
  text "-VE" at 478.74,420.87 h45 r270
  text "TOUCH INPUT" at -51.18,358.66 h45 r270
  text "+VE" at 478.74,276.38 h45 r270
  text "THERMISTOR" at 221.65,201.18 h30
  text "GND" at 322.16,-745.35 h30 r90
  text "VBUS" at 281.16,-747.35 h30 r90
Fllex1 Bottom Overlay 1:
  text "-VE" at 583.46,340.63 h30
  text "+VE" at 583.46,254.72 h30
  text "VBUS" at 250.16,-746.94 h30 r270
Mechanical 1:
  text "38(mm) x 16.15(mm) is the inner casing size required for Complete PCB." at -278.35,1692.91 h45
Mechanical 2:
  lines w10: -57.63,5.37 -57.63,638.03 -277.32,638.03 -277.32,1046.3 -57.63,1046.3 ; -57.46,5.37 ccw(c3.75,7.19) -1.48,-53.83 ; -2.08,-53.74 46.46,-53.74 ; 43.19,-53.74 526.48,-53.74 ; 231.57,-55.4 248.16,-71.98 248.16,-837.98 261.17,-851 318.14,-851 332.16,-836.98 332.16,-72.98 349.74,-55.4 ; 522.25,1441.9 cw(c517.01,1380.88) 578.24,1382.18 578.25,1.26 ; 522.25,1442.14 -57.63,1442.14 ; 526.07,-53.74 ccw(c517.19,6.85) 578.2,1.62 ; -57.63,1046.3 -57.63,1442.14 ; -57.63,1046.3 -57.63,1442.14

## Dimensions
578.24,1382.18 to -293.51,1082.52 on Mechanical 1
522.25,1442.14 to 526.48,-53.74 on Mechanical 1
578.25,1.26 to -57.63,1442.14 on Mechanical 1